# Altium PCB MainBoardPCB_4.PcbDoc (part 12 of 32)
Units mm, origin at the board's own origin, x right, y up, seen from the top; angles counter-clockwise.
Board outline 333.63 x 349.38 mm, 16 copper layers (L1, L2 (GND), L3 (Sign), L4 (GND), L5 (Sign), L6 (PWR/GND), L7(PWR/GND), L8 (Plane_GND), L9 (PWR/GND), L10 (PWR/GND), L11 (PWR/GND), L12 (Sign), L13 (GND), L14 (Sign), L15 (GND), L16), stack 2.502 mm thick; 2205 components, 1648 nets, 8314 pads, 3172 vias.
Unrouted connection lines stored in the file: 5141.
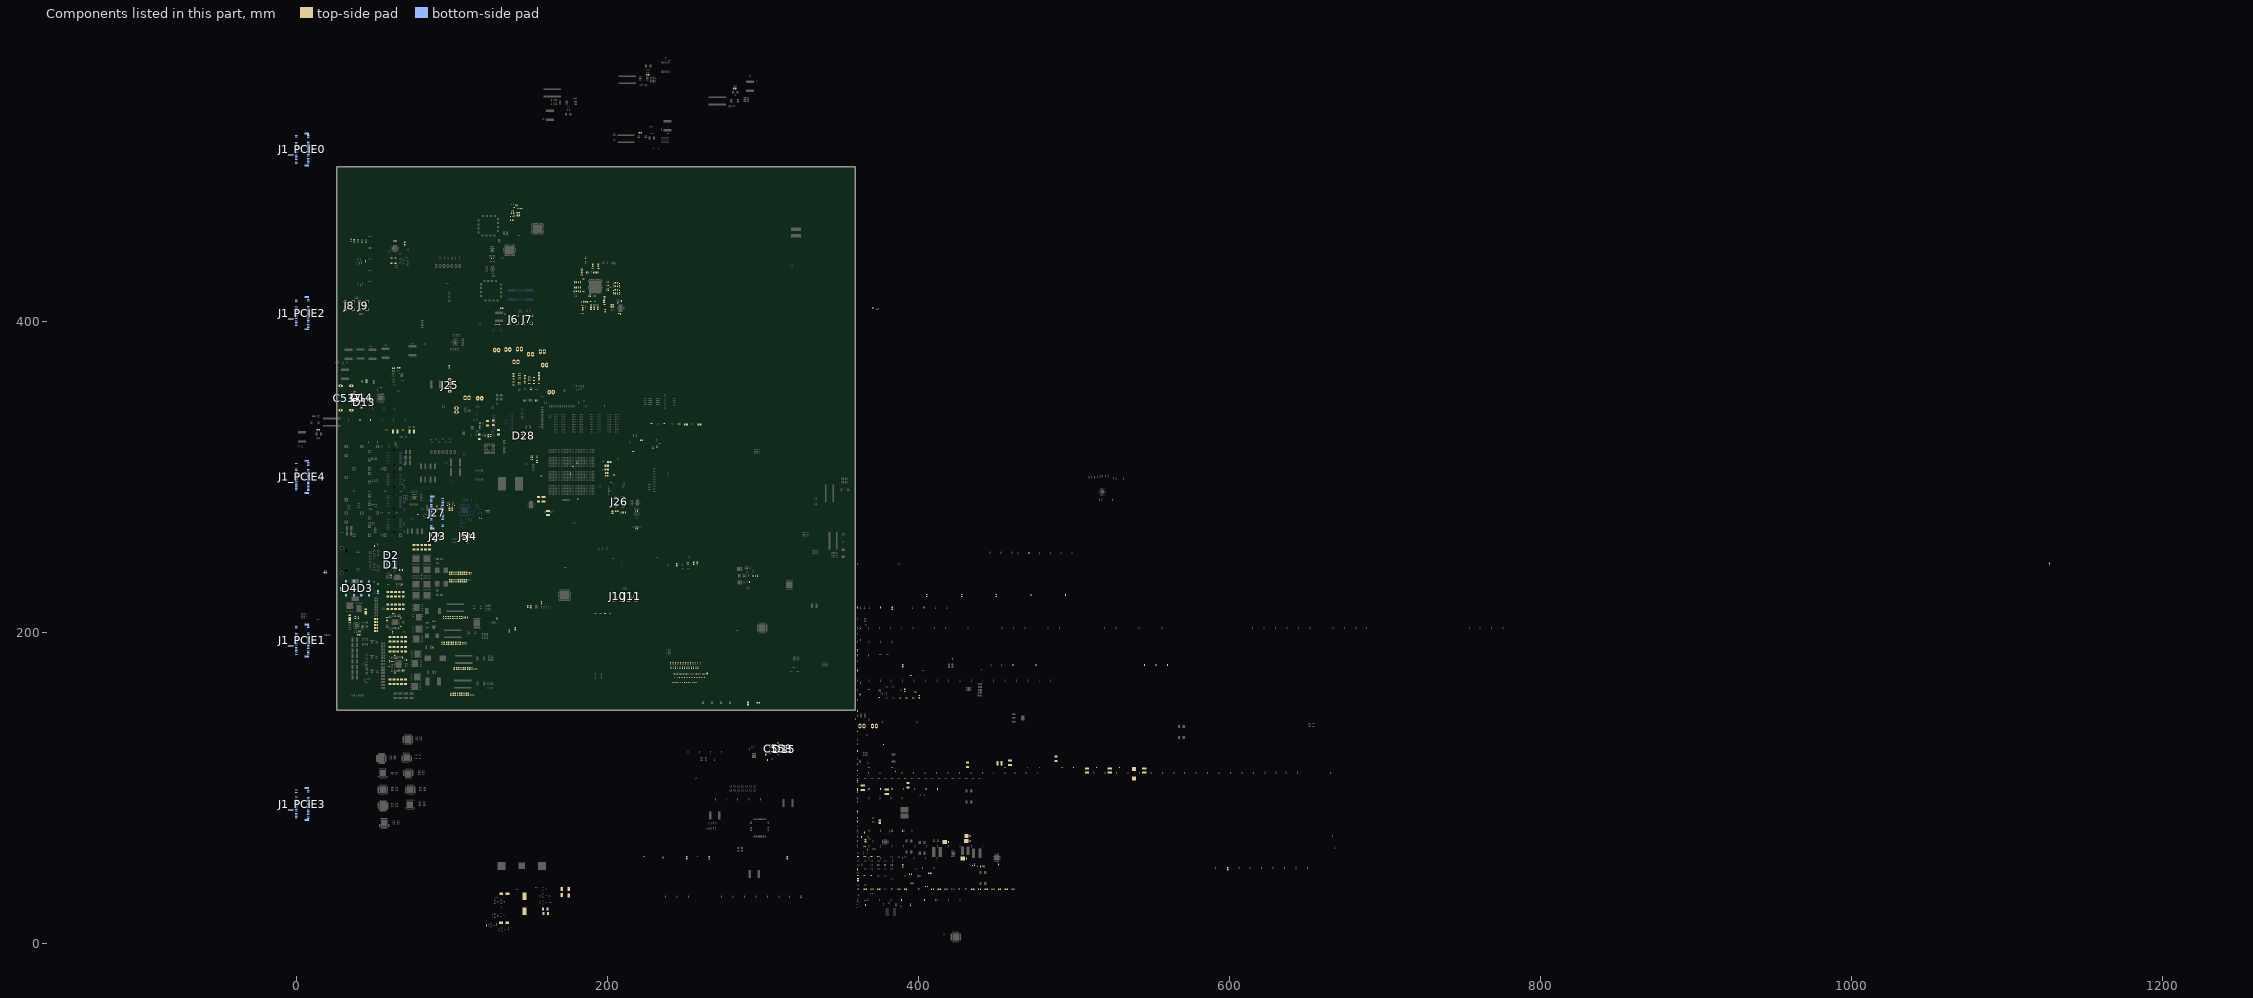
[diagram p19: the components of this part, seen from the top]

## Part data (continued)
FB26 FB27 FB31 FB32 FB43 FB44: library part Ferrite, "FERRITE BEAD 220 OHM 0603 1LN", Case/Package=0603, Case Code (Metric)=1608, Current Rating=2.5A, DC Resistance (DCR)=40mR, Manufacturer=Murata, Manufacturer Part Number=BLM18SG221TN1D, Max Operating Temperature=125°C, Min Operating Temperature=-55°C, Package Quantity=1, Supplier Part Number 1=490-5225-1-ND, Test Frequency=100MHz, Tolerance=25%, Case Code (Imperial)=0603, Category=Inductors, ComponentLink1Description=https://datasheet.ciiva.com/1561/c31e-1561456.pdf?src-supplier=Newark, ComponentLink1URL=https://datasheet.ciiva.com/1561/c31e-1561456.pdf?src-supplier=Newark, ComponentLink2Description=https://datasheet.ciiva.com/41449/001171724-da-01-en-chip-drossel0603-220r-2500ma-1-6x0-8mm-41449352.pdf?src-supplier=Conrad, ComponentLink2URL=https://datasheet.ciiva.com/41449/001171724-da-01-en-chip-drossel0603-220r-2500ma-1-6x0-8mm-41449352.pdf?src-supplier=Conrad, ComponentLink3Description=https://datasheet.ciiva.com/41449/001172313-da-01-en-drossel-0603-220r-21-6x0-8mm-10000st-41449677.pdf?src-supplier=Conrad, ComponentLink3URL=https://datasheet.ciiva.com/41449/001172313-da-01-en-drossel-0603-220r-21-6x0-8mm-10000st-41449677.pdf?src-supplier=Conrad, ComponentLink4Description=https://datasheet.ciiva.com/1012/l0110s0100blm18s-1012626.pdf?src-supplier=Digi-Key, ComponentLink4URL=https://datasheet.ciiva.com/1012/l0110s0100blm18s-1012626.pdf?src-supplier=Digi-Key, ComponentLink5Description=https://datasheet.ciiva.com/1012/l0110s0100blm18s-1012627.pdf?src-supplier=Digi-Key, ComponentLink5URL=https://datasheet.ciiva.com/1012/l0110s0100blm18s-1012627.pdf?src-supplier=Digi-Key, ComponentLink6Description=https://datasheet.ciiva.com/1012/l0110s0100blm18s-1012628.pdf?src-supplier=Digi-Key, ComponentLink6URL=https://datasheet.ciiva.com/1012/l0110s0100blm18s-1012628.pdf?src-supplier=Digi-Key, ComponentLink7Description=https://datasheet.ciiva.com/17279/l0110s0100blm18s-17279573.pdf?src-supplier=Avnet+Europe, ComponentLink7URL=https://datasheet.ciiva.com/17279/l0110s0100blm18s-17279573.pdf?src-supplier=Avnet+Europe, ComponentLink8Description=https://datasheet.ciiva.com/8508/l0110s0100blm18s-8508310.pdf?src-supplier=Avnet, ComponentLink8URL=https://datasheet.ciiva.com/8508/l0110s0100blm18s-8508310.pdf?src-supplier=Avnet, ComponentLink9Description=https://datasheet.ciiva.com/8021/5151-8021517.pdf?src-supplier=Element14, ComponentLink9URL=https://datasheet.ciiva.com/8021/5151-8021517.pdf?src-supplier=Element14, ComponentLink10Description=https://datasheet.ciiva.com/16204/l0110s0100blm18s-16204029.pdf?src-supplier=Future+Electronics, ComponentLink10URL=https://datasheet.ciiva.com/16204/l0110s0100blm18s-16204029.pdf?src-supplier=Future+Electronics, ComponentLink11Description=https://datasheet.ciiva.com/14122/blm-series-eng-tds-14122910.pdf?src-supplier=Distrelec, ComponentLink11URL=https://datasheet.ciiva.com/14122/blm-series-eng-tds-14122910.pdf?src-supplier=Distrelec, ComponentLink12Description=https://datasheet.ciiva.com/8021/5151-8021519.pdf?src-supplier=Element14, ComponentLink12URL=https://datasheet.ciiva.com/8021/5151-8021519.pdf?src-supplier=Element14, Core Material=Ferrite, DC Current=2.5A, Depth=0.95mm, Height=0.8mm, Impedance=220R, Lead Free="Lead Free", Length=1.6mm, Material=Ferrite,Steel, Max Current Rating=2.5A, Max DC Current=2.5A, Number of Circuits=1, Number of Lines=1, Number of Pins=2, Packaging="Tape and Reel", Pricing 1="1=0,14000, 10=0,11600, 25=0,09040, 50=0,07500, 100=0,06460, 250=0,05172, 500=0,04654, 1000=0,03878, 5000=0,03619 (USD)", Radiation Hardening=No, REACH SVHC="No SVHC", RoHS=Yes, Stock 1=123623, Supplier 1=Digi-Key, Termination=SMD/SMT, Weight=7.1E-05oz, Width=0.8mm
FB28 FB29: library part Ferrite, "FERRITE BEAD 220 OHM 0603 1LN", Case/Package=0603, Case Code (Metric)=1608, DC Resistance (DCR)=50mR, Manufacturer=TDK, Manufacturer Part Number=MPZ1608S221ATD25, Max Current Rating=2.2A, Max Operating Temperature=125°C, Min Operating Temperature=-55°C, Package Quantity=4000, Ratings=AEC-Q200, Supplier Part Number 1=445-172893-1-ND, Test Frequency=100MHz, Tolerance=25%, Case Code (Imperial)=0603, Category="Ferrite Beads and Chips", ComponentLink1Description=http://www.mouser.com/ds/2/400/eads_commercial_power_mpz1608_en-923650.pdf?src-supplier=Mouser, ComponentLink1URL=http://www.mouser.com/ds/2/400/eads_commercial_power_mpz1608_en-923650.pdf?src-supplier=Mouser, ComponentLink2Description=https://product.tdk.com/info/en/catalog/datasheets/beads_automotive_power_mpz1608_en.pdf?src-supplier=Digi-Key, ComponentLink2URL=https://product.tdk.com/info/en/catalog/datasheets/beads_automotive_power_mpz1608_en.pdf?src-supplier=Digi-Key, ComponentLink3Description=https://media.digikey.com/pdf/Data%20Sheets/TDK%20PDFs/MPZ_Series_Br.pdf?src-supplier=Digi-Key, ComponentLink3URL=https://media.digikey.com/pdf/Data%20Sheets/TDK%20PDFs/MPZ_Series_Br.pdf?src-supplier=Digi-Key, Height=0.037inch, Impedance=220R, Lead Free="Lead Free", Length=0.063inch, Max DC Current=2.2A, Mount="Surface Mount", Number of Lines=1, Packaging="Tape and Reel", Pricing 1="1=0,11000, 10=0,08600, 25=0,07720, 50=0,05660, 100=0,04890, 250=0,03860, 500=0,03260, 1000=0,02746 (USD)", RoHS=Yes, Stock 1=8766, Supplier 1=Digi-Key, Termination=SMD/SMT, Weight=7.1E-05oz, Width=0.031inch
FB33: library part Ferrite, "Ferrite SMD 2 A 0.05 Ohm, BLM18EG121SN1D, Murata", Case Code (Imperial)=0603, Case Code (Metric)=1608, Current Rating=2A, DC Resistance (DCR)=40mR, Frequency=100MHz, Manufacturer=Murata, Manufacturer Part Number=BLM18EG121SN1D, Max Operating Temperature=125°C, Min Operating Temperature=-55°C, Package Quantity=1, Supplier Part Number 1=490-3991-1-ND, Tolerance=25%, Case/Package=0603, Category=Inductors, ComponentLink1Description=https://datasheet.ciiva.com/34302/1844926-34302803.pdf?src-supplier=Jameco, ComponentLink1URL=https://datasheet.ciiva.com/34302/1844926-34302803.pdf?src-supplier=Jameco, ComponentLink2Description=https://datasheet.ciiva.com/11795/0900766b811b5866-11795397.pdf?src-supplier=RSComponents, ComponentLink2URL=https://datasheet.ciiva.com/11795/0900766b811b5866-11795397.pdf?src-supplier=RSComponents, ComponentLink3Description=https://datasheet.ciiva.com/41449/001171698-da-01-en-chip-drossel0603-120r-2000ma-1-6x0-8mm-41449378.pdf?src-supplier=Conrad, ComponentLink3URL=https://datasheet.ciiva.com/41449/001171698-da-01-en-chip-drossel0603-120r-2000ma-1-6x0-8mm-41449378.pdf?src-supplier=Conrad, ComponentLink4Description=https://datasheet.ciiva.com/41449/001172264-da-01-en-drossel-0603-120r-1-6x0-8mm-4000st-41449582.pdf?src-supplier=Conrad, ComponentLink4URL=https://datasheet.ciiva.com/41449/001172264-da-01-en-drossel-0603-120r-1-6x0-8mm-4000st-41449582.pdf?src-supplier=Conrad, ComponentLink5Description=https://datasheet.ciiva.com/1467/5169-1467155.pdf?src-supplier=Element14, ComponentLink5URL=https://datasheet.ciiva.com/1467/5169-1467155.pdf?src-supplier=Element14, ComponentLink6Description=https://datasheet.ciiva.com/1467/5169-1467156.pdf?src-supplier=Element14, ComponentLink6URL=https://datasheet.ciiva.com/1467/5169-1467156.pdf?src-supplier=Element14, ComponentLink7Description=https://datasheet.ciiva.com/18092/getdatasheetpartid-120977-18092965.pdf?src-supplier=Verical, ComponentLink7URL=https://datasheet.ciiva.com/18092/getdatasheetpartid-120977-18092965.pdf?src-supplier=Verical, ComponentLink8Description=https://datasheet.ciiva.com/6211/l0110s0101blm18e-6211463.pdf?src-supplier=Digi-Key, ComponentLink8URL=https://datasheet.ciiva.com/6211/l0110s0101blm18e-6211463.pdf?src-supplier=Digi-Key, ComponentLink9Description=https://datasheet.ciiva.com/16387/l0110s0101blm18e-16387655.pdf?src-supplier=Future+Electronics, ComponentLink9URL=https://datasheet.ciiva.com/16387/l0110s0101blm18e-16387655.pdf?src-supplier=Future+Electronics, ComponentLink10Description=https://datasheet.ciiva.com/3081/l0110s0101blm18e-3081624.pdf?src-supplier=Avnet, ComponentLink10URL=https://datasheet.ciiva.com/3081/l0110s0101blm18e-3081624.pdf?src-supplier=Avnet, ComponentLink11Description=https://datasheet.ciiva.com/14122/blm-series-eng-tds-14122904.pdf?src-supplier=Distrelec, ComponentLink11URL=https://datasheet.ciiva.com/14122/blm-series-eng-tds-14122904.pdf?src-supplier=Distrelec, ComponentLink12Description=https://datasheet.ciiva.com/17279/l0110s0101blm18e-17279548.pdf?src-supplier=Avnet+Europe, ComponentLink12URL=https://datasheet.ciiva.com/17279/l0110s0101blm18e-17279548.pdf?src-supplier=Avnet+Europe, Core Material=Ferrite, DC Current=2A, Depth=0.8mm, Height=0.8mm, Impedance=120R, Lead Free="Lead Free", Length=1.6mm, Material=Steel,Ferrite, Max Current Rating=2A, Max DC Current=2A, Military Standard=Not, Number of Circuits=1, Number of Lines=1, Number of Pins=2, Packaging="Tape and Reel", Pricing 1="1=0,23000, 10=0,17500, 25=0,14520, 50=0,12520, 100=0,11260, 250=0,09508, 500=0,08508, 1000=0,07257 (USD)", Radiation Hardening=No, REACH SVHC="No SVHC", RoHS=Yes, Stock 1=29633, Supplier 1=Digi-Key, Termination=SMD/SMT, Test Frequency=100MHz, Weight=7.1E-05oz, Width=0.8mm
FB34: library part Ferrite, "Ferrite Beads Power Chip 330Ohm 25% 100MHz 800mA 210mOhm DCR 0603 Automotive T/R", Case Code (Imperial)=0603, Case Code (Metric)=1608, DC Resistance (DCR)=210mR, Frequency=100MHz, Manufacturer="Taiyo Yuden", Manufacturer Part Number=FBMH1608HL331-T, Max Current Rating=800mA, Max DC Current=600mA, Max Operating Temperature=125°C, Min Operating Temperature=-40°C, Package Quantity=1, Supplier Part Number 1=587-1734-1-ND, Tolerance=25%, Case/Package=0603, Category="Ferrite Beads and Chips", ComponentLink1Description=https://datasheet.ciiva.com/1012/fbmh1608hl331-t-ss-1012496.pdf?src-supplier=Digi-Key, ComponentLink1URL=https://datasheet.ciiva.com/1012/fbmh1608hl331-t-ss-1012496.pdf?src-supplier=Digi-Key, ComponentLink2Description=https://datasheet.ciiva.com/25614/0900766b810b37be-25614404.pdf?src-supplier=RSComponents, ComponentLink2URL=https://datasheet.ciiva.com/25614/0900766b810b37be-25614404.pdf?src-supplier=RSComponents, ComponentLink3Description=https://datasheet.ciiva.com/1012/chipbeads01-e-1012495.pdf?src-supplier=Digi-Key, ComponentLink3URL=https://datasheet.ciiva.com/1012/chipbeads01-e-1012495.pdf?src-supplier=Digi-Key, ComponentLink4Description=https://datasheet.ciiva.com/1012/chipbeads01-e-1012494.pdf?src-supplier=Digi-Key, ComponentLink4URL=https://datasheet.ciiva.com/1012/chipbeads01-e-1012494.pdf?src-supplier=Digi-Key, Composition="Ferrite Bead", Core Material=Ferrite, Depth=0.95mm, Halogen Free="Halogen Free", Height=0.8mm, Impedance=330R, Lead Free="Lead Free", Length=1.6mm, Material=Ferrite, Mount="Surface Mount", Number of Lines=1, Number of Pins=2, Packaging="Tape and Reel", Pricing 1="1=0,11000, 10=0,09400, 25=0,07320, 50=0,06060, 100=0,05230, 250=0,04180, 500=0,03762, 1000=0,03135 (USD)", RoHS=Yes, Shielding=Unshielded, Stock 1=4788, Supplier 1=Digi-Key, Termination=SMD/SMT, Test Frequency=100MHz, Width=0.031inch
FB38 FB39 FB40 FB41: library part Ferrite, "FERRITE BEAD 600 OHM 0805 1LN", Case Code (Imperial)=0805, Case Code (Metric)=2012, Current Rating=500mA, DC Resistance (DCR)=300mR, Frequency=100MHz, Manufacturer=Laird, Manufacturer Part Number=HZ0805E601R-10, Max Operating Temperature=125°C, Min Operating Temperature=-40°C, Package Quantity=1, Supplier Part Number 1=240-2399-1-ND, Case/Package=0805, Category="Fixed Inductors", ComponentLink1Description=https://datasheet.ciiva.com/22622/1685710-22622833.pdf?src-supplier=Element14, ComponentLink1URL=https://datasheet.ciiva.com/22622/1685710-22622833.pdf?src-supplier=Element14, ComponentLink2Description=https://datasheet.ciiva.com/1013/hz0805e601r-10-1013170.pdf?src-supplier=Digi-Key, ComponentLink2URL=https://datasheet.ciiva.com/1013/hz0805e601r-10-1013170.pdf?src-supplier=Digi-Key, ComponentLink3Description=https://datasheet.ciiva.com/8512/hz0805e601r-10-a-vp-8512772.pdf?src-supplier=Avnet, ComponentLink3URL=https://datasheet.ciiva.com/8512/hz0805e601r-10-a-vp-8512772.pdf?src-supplier=Avnet, ComponentLink4Description=https://datasheet.ciiva.com/16714/70065439-16714006.pdf?src-supplier=Allied+Electronics, ComponentLink4URL=https://datasheet.ciiva.com/16714/70065439-16714006.pdf?src-supplier=Allied+Electronics, Contact Plating=Tin,Matte, Core Material=Ferrite, Depth=1.45mm, Height=1.25mm, Impedance=600R, Lead Free="Lead Free", Length=2mm, Material=Ferrite, Max Current Rating=500mA, Max DC Current=500mA, Mount="Surface Mount", Number of Lines=1, Packaging="Tape and Reel", Pricing 1="1=0,18000, 10=0,14400, 25=0,11200, 50=0,09280, 100=0,07990, 250=0,06396, 500=0,05754, 1000=0,04796 (USD)", REACH SVHC=Unknown, RoHS=Yes, Stock 1=2783878, Supplier 1=Digi-Key, Termination=SMD/SMT, Test Frequency=100MHz, Weight=0.00392oz, Width=0.049inch
FB42: library part Ferrite, "Ind Chip Bead 120Ohm 25% 100MHz Ferrite 3A 0603 Paper T/R", Case Code (Imperial)=0603, Case Code (Metric)=1608, Current Rating=3A, DC Resistance (DCR)=25mR, Frequency=100MHz, Manufacturer=Murata, Manufacturer Part Number=BLM18SG121TN1D, Max Operating Temperature=125°C, Min Operating Temperature=-55°C, Package Quantity=1, Supplier Part Number 1=1515752, Tolerance=25%, Case/Package=0603, Category="Ferrite Beads and Chips", ComponentLink1Description=https://datasheet.ciiva.com/1012/l0110s0100blm18s-1012624.pdf?src-supplier=Digi-Key, ComponentLink1URL=https://datasheet.ciiva.com/1012/l0110s0100blm18s-1012624.pdf?src-supplier=Digi-Key, ComponentLink2Description=https://datasheet.ciiva.com/18093/getdatasheetpartid-295885-18093249.pdf?src-supplier=Verical, ComponentLink2URL=https://datasheet.ciiva.com/18093/getdatasheetpartid-295885-18093249.pdf?src-supplier=Verical, ComponentLink3Description=https://datasheet.ciiva.com/11799/0900766b811b5866-11799181.pdf?src-supplier=RSComponents, ComponentLink3URL=https://datasheet.ciiva.com/11799/0900766b811b5866-11799181.pdf?src-supplier=RSComponents, ComponentLink4Description=https://datasheet.ciiva.com/41449/001171723-da-01-en-chip-drossel0603-120r-3000ma-1-6x0-8mm-41449353.pdf?src-supplier=Conrad, ComponentLink4URL=https://datasheet.ciiva.com/41449/001171723-da-01-en-chip-drossel0603-120r-3000ma-1-6x0-8mm-41449353.pdf?src-supplier=Conrad, ComponentLink5Description=https://datasheet.ciiva.com/41449/001172312-da-01-en-drossel-0603-120r-1-6x0-8mm-10000st-41449675.pdf?src-supplier=Conrad, ComponentLink5URL=https://datasheet.ciiva.com/41449/001172312-da-01-en-drossel-0603-120r-1-6x0-8mm-10000st-41449675.pdf?src-supplier=Conrad, ComponentLink6Description=https://datasheet.ciiva.com/1012/l0110s0100blm18s-1012625.pdf?src-supplier=Digi-Key, ComponentLink6URL=https://datasheet.ciiva.com/1012/l0110s0100blm18s-1012625.pdf?src-supplier=Digi-Key, ComponentLink7Description=https://datasheet.ciiva.com/8021/5151-8021511.pdf?src-supplier=Element14, ComponentLink7URL=https://datasheet.ciiva.com/8021/5151-8021511.pdf?src-supplier=Element14, ComponentLink8Description=https://datasheet.ciiva.com/8021/5151-8021512.pdf?src-supplier=Element14, ComponentLink8URL=https://datasheet.ciiva.com/8021/5151-8021512.pdf?src-supplier=Element14, ComponentLink9Description=https://datasheet.ciiva.com/14122/blm-series-eng-tds-14122906.pdf?src-supplier=Distrelec, ComponentLink9URL=https://datasheet.ciiva.com/14122/blm-series-eng-tds-14122906.pdf?src-supplier=Distrelec, ComponentLink10Description=https://datasheet.ciiva.com/16395/l0110s0100blm18s-16395498.pdf?src-supplier=Future+Electronics, ComponentLink10URL=https://datasheet.ciiva.com/16395/l0110s0100blm18s-16395498.pdf?src-supplier=Future+Electronics, ComponentLink11Description=https://datasheet.ciiva.com/1012/l0110s0100blm18s-1012623.pdf?src-supplier=Digi-Key, ComponentLink11URL=https://datasheet.ciiva.com/1012/l0110s0100blm18s-1012623.pdf?src-supplier=Digi-Key, ComponentLink12Description=https://datasheet.ciiva.com/17246/l0110s0100blm18s-17246943.pdf?src-supplier=Avnet+Europe, ComponentLink12URL=https://datasheet.ciiva.com/17246/l0110s0100blm18s-17246943.pdf?src-supplier=Avnet+Europe, Core Material=Ferrite, Depth=0.8mm, Height=0.8mm, Impedance=120R, Lead Free="Lead Free", Length=1.6mm, Material=Steel,Ferrite, Max Current Rating=3A, Max DC Current=3A, Number of Circuits=1, Number of Lines=1, Number of Pins=2, Packaging="Tape and Reel", REACH SVHC="No SVHC", RoHS=Yes, Shielding=Unshielded, Stock 1=47191, Supplier 1=Farnell, Termination=SMD/SMT, Test Frequency=100MHz, Width=0.8mm
FB45: library part Ferrite, "Ferrite SMD 2 A 0.05 Ohm, BLM18EG121SN1D, Murata", Case/Package=0603, Case Code (Metric)=1608, Current Rating=2A, DC Resistance (DCR)=40mR, Frequency=100MHz, Manufacturer=Murata, Manufacturer Part Number=BLM18EG121SN1D, Max Operating Temperature=125°C, Min Operating Temperature=-55°C, Package Quantity=1, Supplier Part Number 1=490-3991-1-ND, Tolerance=25%, Case Code (Imperial)=0603, Category=Inductors, ComponentLink1Description=https://datasheet.ciiva.com/34302/1844926-34302803.pdf?src-supplier=Jameco, ComponentLink1URL=https://datasheet.ciiva.com/34302/1844926-34302803.pdf?src-supplier=Jameco, ComponentLink2Description=https://datasheet.ciiva.com/11795/0900766b811b5866-11795397.pdf?src-supplier=RSComponents, ComponentLink2URL=https://datasheet.ciiva.com/11795/0900766b811b5866-11795397.pdf?src-supplier=RSComponents, ComponentLink3Description=https://datasheet.ciiva.com/41449/001171698-da-01-en-chip-drossel0603-120r-2000ma-1-6x0-8mm-41449378.pdf?src-supplier=Conrad, ComponentLink3URL=https://datasheet.ciiva.com/41449/001171698-da-01-en-chip-drossel0603-120r-2000ma-1-6x0-8mm-41449378.pdf?src-supplier=Conrad, ComponentLink4Description=https://datasheet.ciiva.com/41449/001172264-da-01-en-drossel-0603-120r-1-6x0-8mm-4000st-41449582.pdf?src-supplier=Conrad, ComponentLink4URL=https://datasheet.ciiva.com/41449/001172264-da-01-en-drossel-0603-120r-1-6x0-8mm-4000st-41449582.pdf?src-supplier=Conrad, ComponentLink5Description=https://datasheet.ciiva.com/1467/5169-1467155.pdf?src-supplier=Element14, ComponentLink5URL=https://datasheet.ciiva.com/1467/5169-1467155.pdf?src-supplier=Element14, ComponentLink6Description=https://datasheet.ciiva.com/1467/5169-1467156.pdf?src-supplier=Element14, ComponentLink6URL=https://datasheet.ciiva.com/1467/5169-1467156.pdf?src-supplier=Element14, ComponentLink7Description=https://datasheet.ciiva.com/18092/getdatasheetpartid-120977-18092965.pdf?src-supplier=Verical, ComponentLink7URL=https://datasheet.ciiva.com/18092/getdatasheetpartid-120977-18092965.pdf?src-supplier=Verical, ComponentLink8Description=https://datasheet.ciiva.com/6211/l0110s0101blm18e-6211463.pdf?src-supplier=Digi-Key, ComponentLink8URL=https://datasheet.ciiva.com/6211/l0110s0101blm18e-6211463.pdf?src-supplier=Digi-Key, ComponentLink9Description=https://datasheet.ciiva.com/16387/l0110s0101blm18e-16387655.pdf?src-supplier=Future+Electronics, ComponentLink9URL=https://datasheet.ciiva.com/16387/l0110s0101blm18e-16387655.pdf?src-supplier=Future+Electronics, ComponentLink10Description=https://datasheet.ciiva.com/3081/l0110s0101blm18e-3081624.pdf?src-supplier=Avnet, ComponentLink10URL=https://datasheet.ciiva.com/3081/l0110s0101blm18e-3081624.pdf?src-supplier=Avnet, ComponentLink11Description=https://datasheet.ciiva.com/14122/blm-series-eng-tds-14122904.pdf?src-supplier=Distrelec, ComponentLink11URL=https://datasheet.ciiva.com/14122/blm-series-eng-tds-14122904.pdf?src-supplier=Distrelec, ComponentLink12Description=https://datasheet.ciiva.com/17279/l0110s0101blm18e-17279548.pdf?src-supplier=Avnet+Europe, ComponentLink12URL=https://datasheet.ciiva.com/17279/l0110s0101blm18e-17279548.pdf?src-supplier=Avnet+Europe, Core Material=Ferrite, DC Current=2A, Depth=0.8mm, Height=0.8mm, Impedance=120R, Lead Free="Lead Free", Length=1.6mm, Material=Steel,Ferrite, Max Current Rating=2A, Max DC Current=2A, Military Standard=Not, Number of Circuits=1, Number of Lines=1, Number of Pins=2, Packaging="Tape and Reel", Pricing 1="1=0,23000, 10=0,17500, 25=0,14520, 50=0,12520, 100=0,11260, 250=0,09508, 500=0,08508, 1000=0,07257 (USD)", Radiation Hardening=No, REACH SVHC="No SVHC", RoHS=Yes, Stock 1=29633, Supplier 1=Digi-Key, Termination=SMD/SMT, Test Frequency=100MHz, Weight=7.1E-05oz, Width=0.8mm
J1_PCIE0 J1_PCIE1 J1_PCIE2 J1_PCIE3 J1_PCIE4: library part 1-2199230-6, "CONN EDGE DUAL FMALE 67POS 0.020", Contact Current Rating=500mA, Housing Color=Black, Manufacturer 1="TE Connectivity", Package Quantity=1, Supplier Part Number 1=A118046CT-ND, ComponentLink1Description=https://datasheet.ciiva.com/29349/eng-cd-2199230-b1-c-2199230-b1-29349141.pdf?src-supplier=Digi-Key, ComponentLink1URL=https://datasheet.ciiva.com/29349/eng-cd-2199230-b1-c-2199230-b1-29349141.pdf?src-supplier=Digi-Key, Contact Material="Copper Alloy", Contact Plating=Gold,Matte, ELV=Compliant, Height=0.165inch, Housing Material=Thermoplastic, Length=0.862inch, Manufacturer Part Number 1=1-2199230-6, Mount="Surface Mount", Number of Positions=67, Number of Rows=2, Orientation="Right Angle", Packaging="Tape and Reel", PCB Mounting Orientation="Right Angle", Pitch=0.5mm, Pricing 1="1=1,59000, 10=1,43900, 25=1,35120, 50=1,29220, 100=1,23350, 250=1,11608, 500=1,02796 (USD)", RoHS=Yes, Stock 1=3265, Supplier 1=Digi-Key, Width=8.7mm
J2 J3 J4 J5: "Ultra Miniature Coaxial Connector Jack, 60 V, 50 Ohm, -40 to 90 degC, RoHS, Tape and Reel", Maximum Frequency="6 GHz", Operating Temperature Range="- 40 C to + 90 C", Supplier Part Number 1=62X0488, Body Material="Liquid Crystal Polymer (LCP)", Brand="TE Connectivity / AMP", ComponentLink1Description="Manufacturer URL", ComponentLink1URL=http://www.te.com, ComponentLink2Description=Datasheet, ComponentLink2URL=http://www.te.com/commerce/DocumentDelivery/DDEController?Action=srchrtrv&DocNm=1909763&DocType=Customer+Drawing&DocLang=English, Contact Material="Copper Alloy", Contact Plating=Gold, DatasheetVersion="Rev. B2", Factory Pack Quantity=5000, Gender="Jack (Female)", Impedance="50 Ohms", Mounting Technology="Surface Mount", Orientation=Straight, PackageDescription="3-Pin Surface Mount Device, Body 2.6 x 2.6 mm", PackageReference=SMD, Packaging=Reel, Product=Connectors, Product Category="RF Connectors / Coaxial Connectors", RF Series=UMCC, RoHS=Details, Supplier 1=Newark, Supplier 2=Farnell, Supplier 3=Digi-Key, Supplier 4=Digi-Key, Supplier 5=Digi-Key, Supplier Part Number 2=2781689, Supplier Part Number 3=A118077TR-ND, Supplier Part Number 4=A118077CT-ND, Supplier Part Number 5=A118077DKR-ND
J6 J7 J8 J9 J10 J11 J26: "SMA Connector, Pitch 5.08 mm, 1 Position, Height 9.5 mm, Tail Length 4 mm, -65 to 165 degC, RoHS, Bulk", Frequency Max=3GHz, Supplier Part Number 1=78M7270, Coaxial Cable Types=-, Coaxial Termination=Solder, ComponentLink1Description="Manufacturer URL", ComponentLink1URL=http://www.te.com, ComponentLink2Description=Datasheet, ComponentLink2URL=http://www.onlinecomponents.com/productFiles/mf-AMP/eng_cd_1814832_a.pdf, Connector Body Style="Straight Jack", Connector Mounting="PCB Mount", Connector Type="SMA Coaxial", Contact Material="Beryllium Copper", Contact Plating="Gold Plated Contacts", DatasheetVersion="Rev. B1", Impedance=50ohm, Mounting Technology="Through Hole", PackageDescription="SMA Connector, Pitch 5.08 mm, 1 Position, Height 9.5 mm, Tail Length 4 mm", PackageReference=THD, Product Range="ZDC Series", Supplier 1=Newark, Supplier 2=Newark, Supplier 3=Farnell, Supplier 4=Digi-Key, Supplier Part Number 2=13M4002, Supplier Part Number 3=1248990, Supplier Part Number 4=A97594-ND, SVHC="No SVHC (15-Jun-2015)"
J12 J13 J15 J16 J17 J19 J20 J21 J22 J23 J24 J29 J30: library part "2 Pin"
J25: library part "4 Pin"
J27: library part 1-2199230-6_CHINA, "CONN EDGE DUAL FMALE 67POS 0.020", Contact Current Rating=500mA, Housing Color=Black, Manufacturer 1="TE Connectivity", Manufacturer Part Number 1=1-2199230-6, Package Quantity=1, Supplier Part Number 1=A118046CT-ND, ComponentLink1Description=https://datasheet.ciiva.com/29349/eng-cd-2199230-b1-c-2199230-b1-29349141.pdf?src-supplier=Digi-Key, ComponentLink1URL=https://datasheet.ciiva.com/29349/eng-cd-2199230-b1-c-2199230-b1-29349141.pdf?src-supplier=Digi-Key, Contact Material="Copper Alloy", Contact Plating=Gold,Matte, ELV=Compliant, Height=0.165inch, Housing Material=Thermoplastic, Length=0.862inch, Mount="Surface Mount", Number of Positions=67, Number of Rows=2, Orientation="Right Angle", Packaging="Tape and Reel", PCB Mounting Orientation="Right Angle", Pitch=0.5mm, Pricing 1="1=1,59000, 10=1,43900, 25=1,35120, 50=1,29220, 100=1,23350, 250=1,11608, 500=1,02796 (USD)", RoHS=Yes, Stock 1=3265, Supplier 1=Digi-Key, Width=8.7mm